# Altium PCB ika_pcb.PcbDoc (part 2 of 3)
Units mil, origin at the board's own origin, x right, y up, seen from the top; angles counter-clockwise.
Board outline 5430 x 4360 mil, 2 copper layers (Top Layer, Bottom Layer); 129 components, 109 nets, 436 pads, 110 vias.
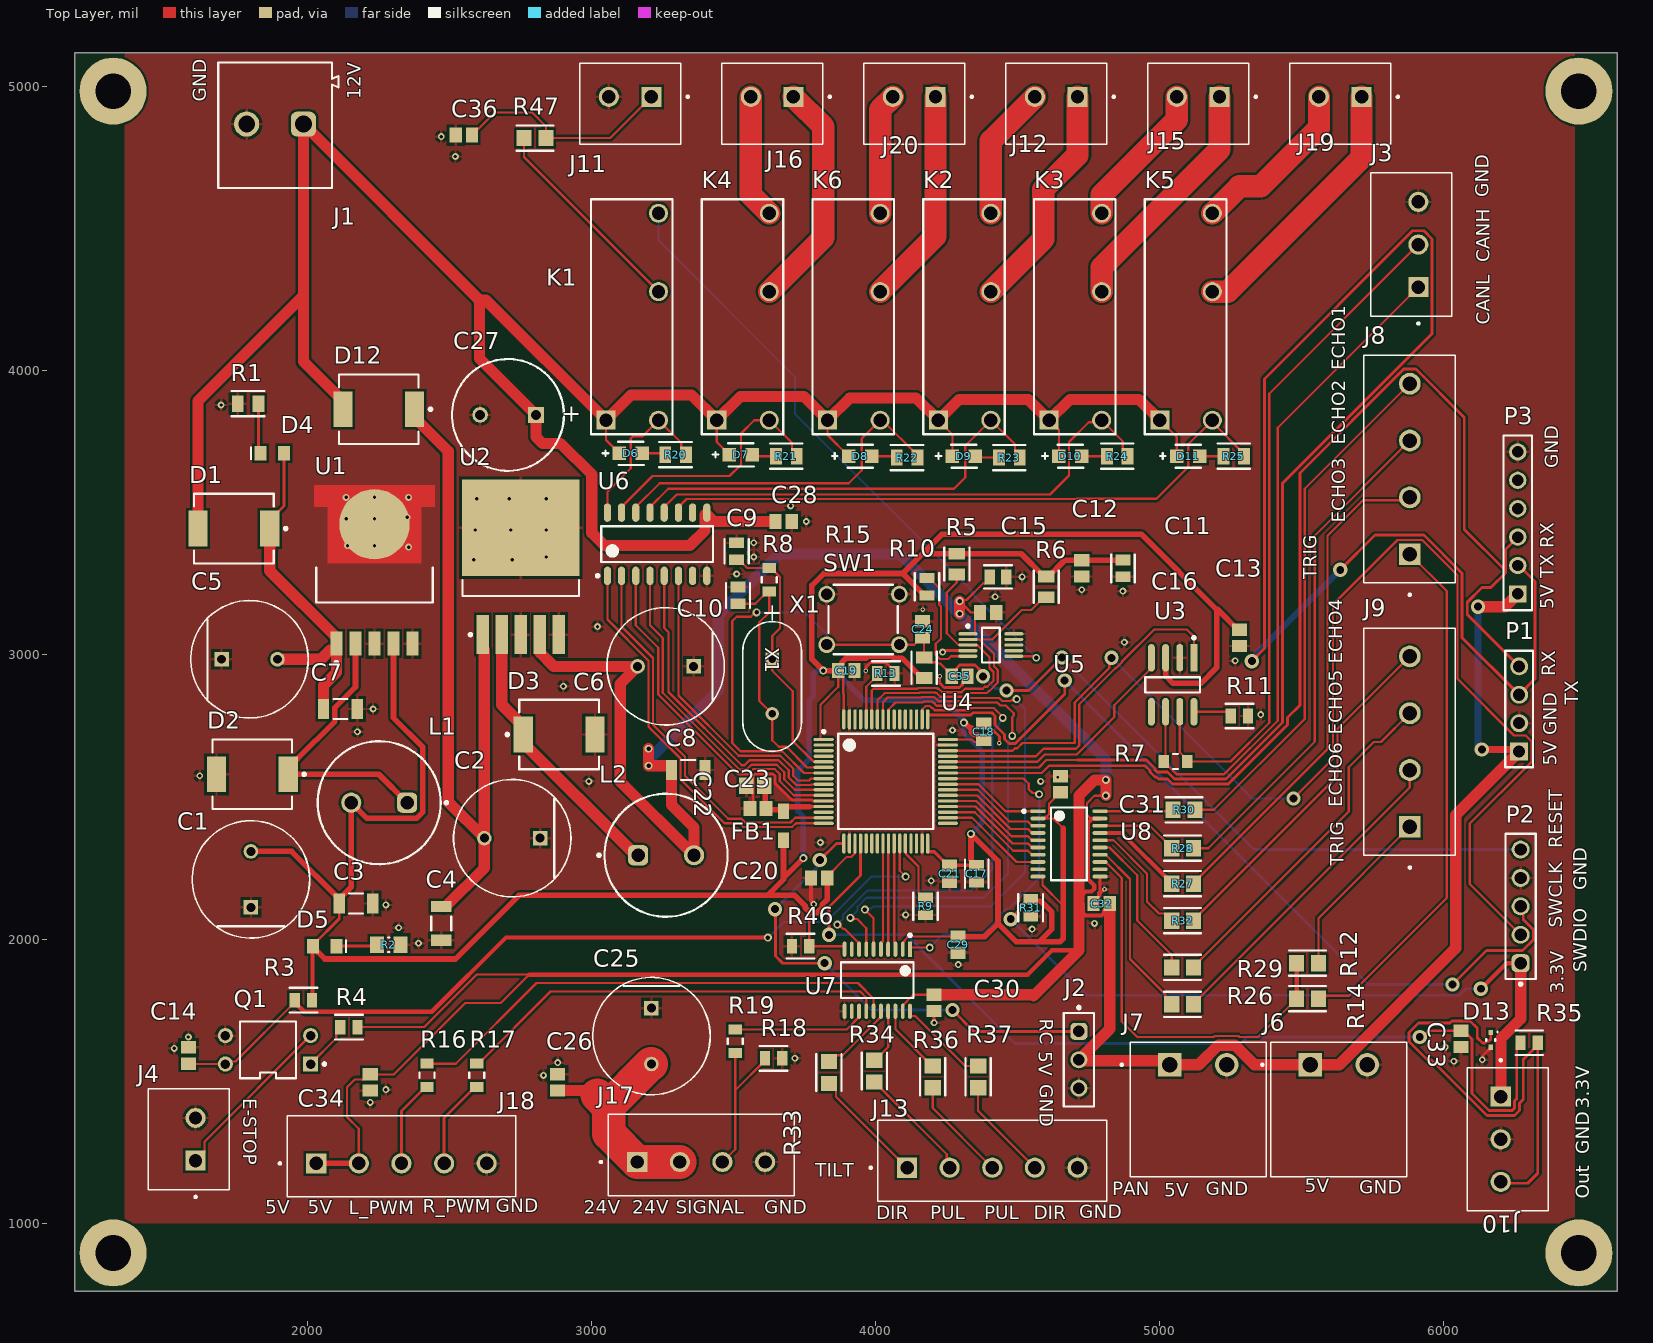
[diagram p0: Top Layer view]

## Part data (continued)
U6: library part CMP-2000-04953-1, "High-Voltage, High-Current Darlington Transistor Array, 0.5 A, 50 V, -20 to 70 degC, 16-Pin SOIC (D), Green (RoHS & no Sb/Br), Tape and Reel", Manufacturer=TexasInstruments, Maximum Collector Emitter Saturation Voltage=1.1@100mA, Maximum Collector Emitter Voltage=50V, Package=16SOIC, Package Description="16-Pin Plastic Small Outline, Body 9.9 x 3.9 mm, Pitch 1.27 mm", Package Reference=D16, Package Version="4040047-6/M, 06/2011", Peak DC Collector Current=0.5A, Category=DarlingtonBJT, Configuration=Array7, Datasheet URL=http://www.ti.com/general/docs/lit/getliterature.tsp?genericPartNumber=uln2003a&fileType=pdf, Datasheet Version="Rev. O, 01/2016", Manufacturer URL=http://www.ti.com/, Mounting=SurfaceMount, Package URL=http://www.ti.com/lit/ml/mpds178g/mpds178g.pdf, Packaging=Tape&Reel, Rad Hard=No, Type=NPN
U7 U8: library part CMP-2000-04956-2, "IC TRNSLTR BIDIRECTIONAL 20TSSOP", Case/Package=TSSOP, High Level Output Current=-50mA, Low Level Output Current=50mA, Max Operating Temperature=85°C, Max Supply Voltage=5.5V, Min Operating Temperature=-40°C, Min Supply Voltage=1.2V, Nominal Supply Current=8uA, Output Current=620uA, Package Quantity=1, Quiescent Current=3uA, Contact Plating=Gold, Data Rate=60Mbps, Height=1.15mm, Lead Free="Lead Free", Length=6.5mm, Logic Function=Translator, Mount="Surface Mount", Number of Bits=8, Number of Channels=8, Number of Pins=20, Number of Inputs=8, Output Type=Voltage, Packaging="Tape and Reel", Propagation Delay=4.8ns, Radiation Hardening=No, REACH SVHC="No SVHC", Rise Time=6.3ns, RoHS Compliant=Yes, Series=-, Supply Current=8uA, Termination=SMD/SMT, Turn-On Delay Time=312ns, Weight=0.002716oz, Width=4.4mm
X1: "No Description Available", Manufacturer_Name=Raltron, Copyright="Copyright (C) 2026 Ultra Librarian. All rights reserved.", Manufacturer_Part_Number=AS-8.000-18-SP, Type=Crystals

## Free pads (board coordinates)
  round 236.22 hole 125.98 unplated: 1(6475,895) 2(6475,4985) 3(1315,895) 4(1315,4985)

## Via types
v1: diameter 24, hole 12, Top Layer to Bottom Layer, 63 vias
v2: diameter 27.56, hole 15.75, Top Layer to Bottom Layer, 22 vias
v3: diameter 50, hole 28, Top Layer to Bottom Layer, 19 vias
v4: diameter 16, hole 8, Top Layer to Bottom Layer, 5 vias
v5: diameter 12, hole 8, Top Layer to Bottom Layer, 1 vias

## Nets (pads, with @x,y where several pads share a name; then routed paths per layer and width w, separated by ;. In a path a pad name is that pad's centre, name@x,y a point inside that pad or via, vN(x,y) a via of type N, cw(c..) or ccw(c..) an arc to the next point about the centre after c; other vN are vias at no path point)
1C: K1.4 R20.1 U6.16 | length 581.1
  Top Layer w7.87: U6.16@3055,3501.22 3055,3575 3137.5,3657.5 3137.5,3762.5 3145,3770 3178.35,3770 K1.4@3235,3826.65 3314.6,3747.05 3314.6,3721.84 R20.1@3331.44,3705
2C: K4.4 R21.1 U6.15 | length 897.4
  Top Layer w7.87: U6.15@3105,3501.22 3105,3520.91 3214.09,3630 3485,3630 3525,3670 3525,3780 3571.65,3826.65 K4.4@3625,3826.65 3704.6,3747.05 3704.6,3716.84 R21.1@3721.44,3700